# Altium PCB PCB_Adaptor_Board-v1.0.PcbDoc (part 1 of 2)
Units mil, origin at the board's own origin, x right, y up, seen from the top; angles counter-clockwise.
Board outline 5314.96 x 3492.31 mil, 2 copper layers (Top Layer, Bottom Layer), stack 61.811 mil thick; 18 components, 94 nets, 295 pads, 209 vias.
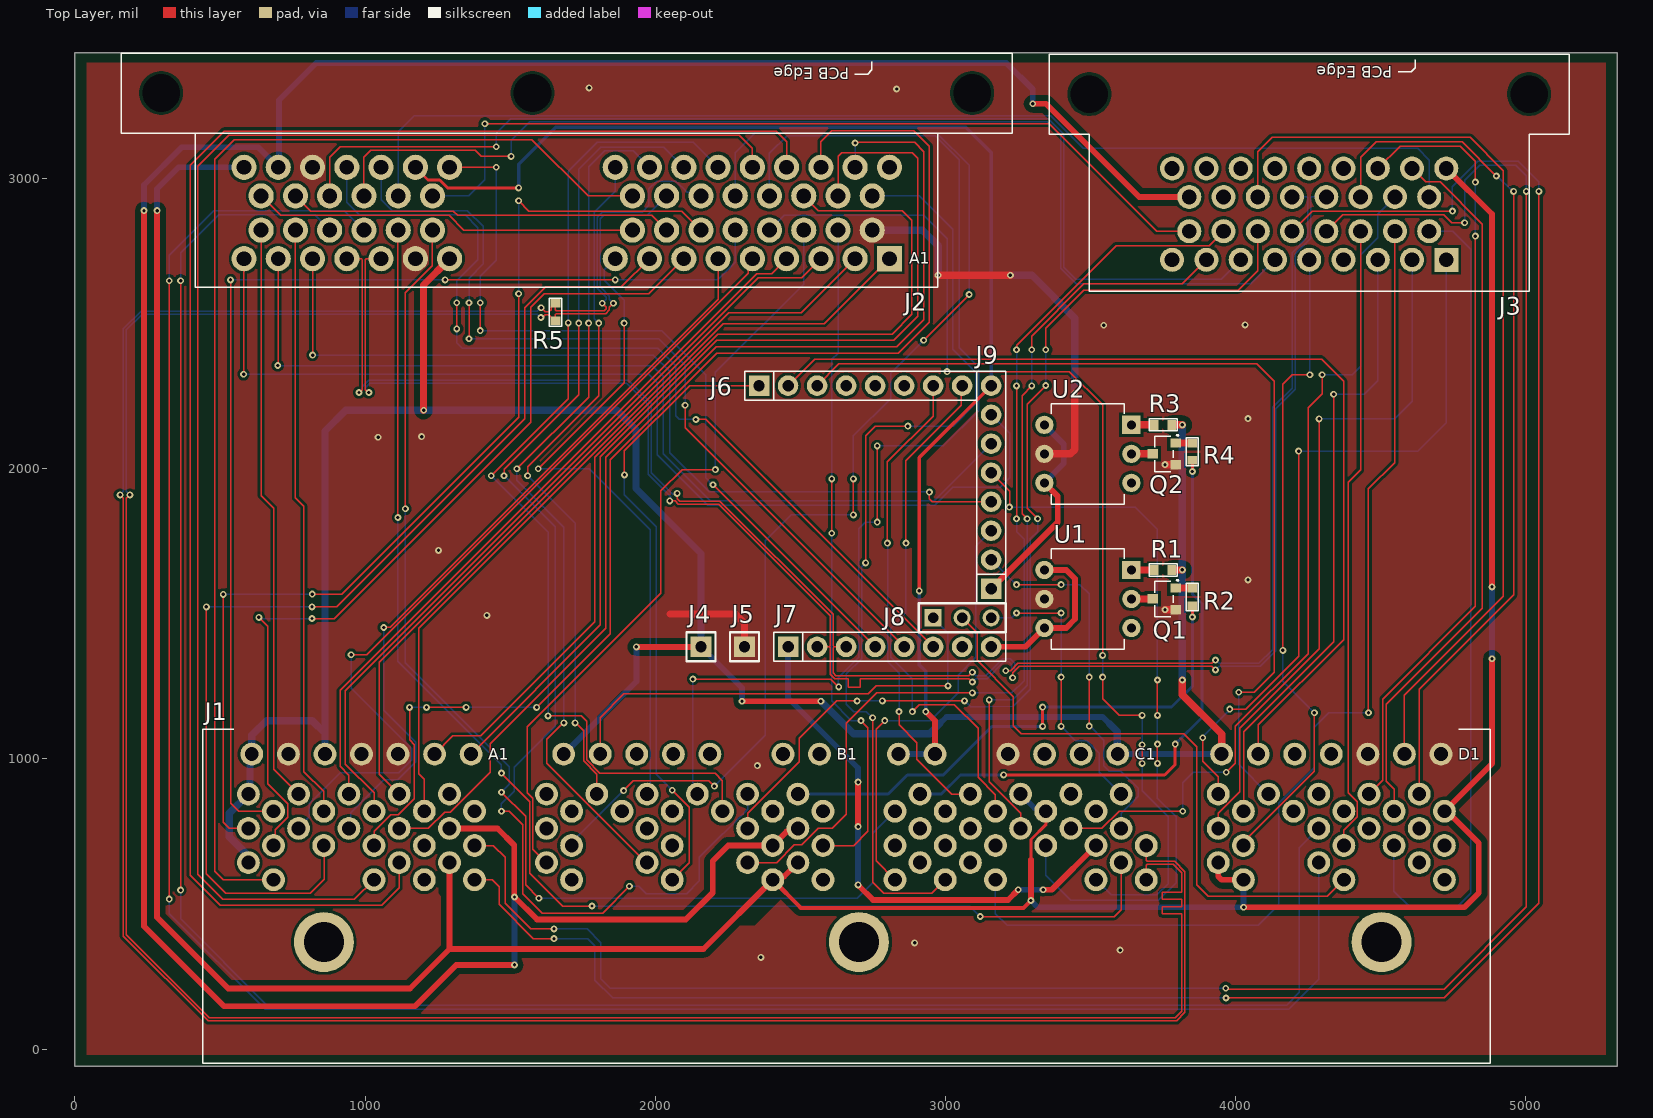
[diagram p0: Top Layer view]
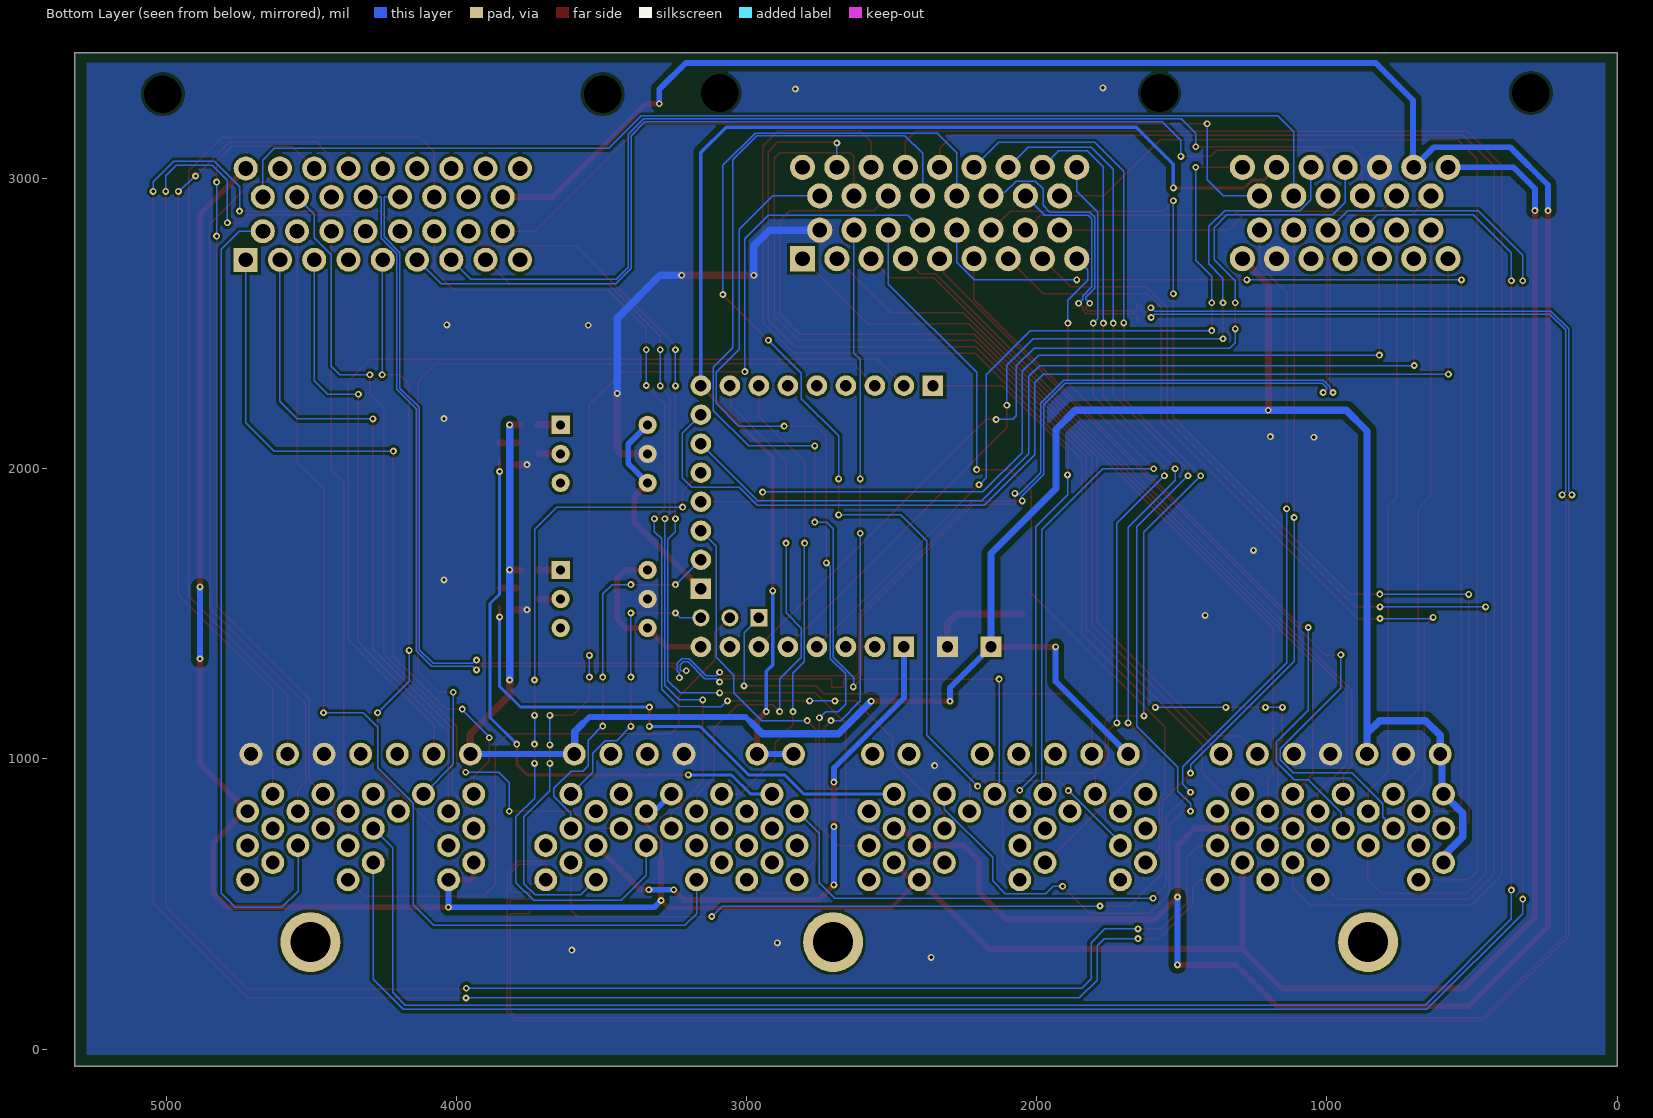
[diagram p1: Bottom Layer view, seen from below]
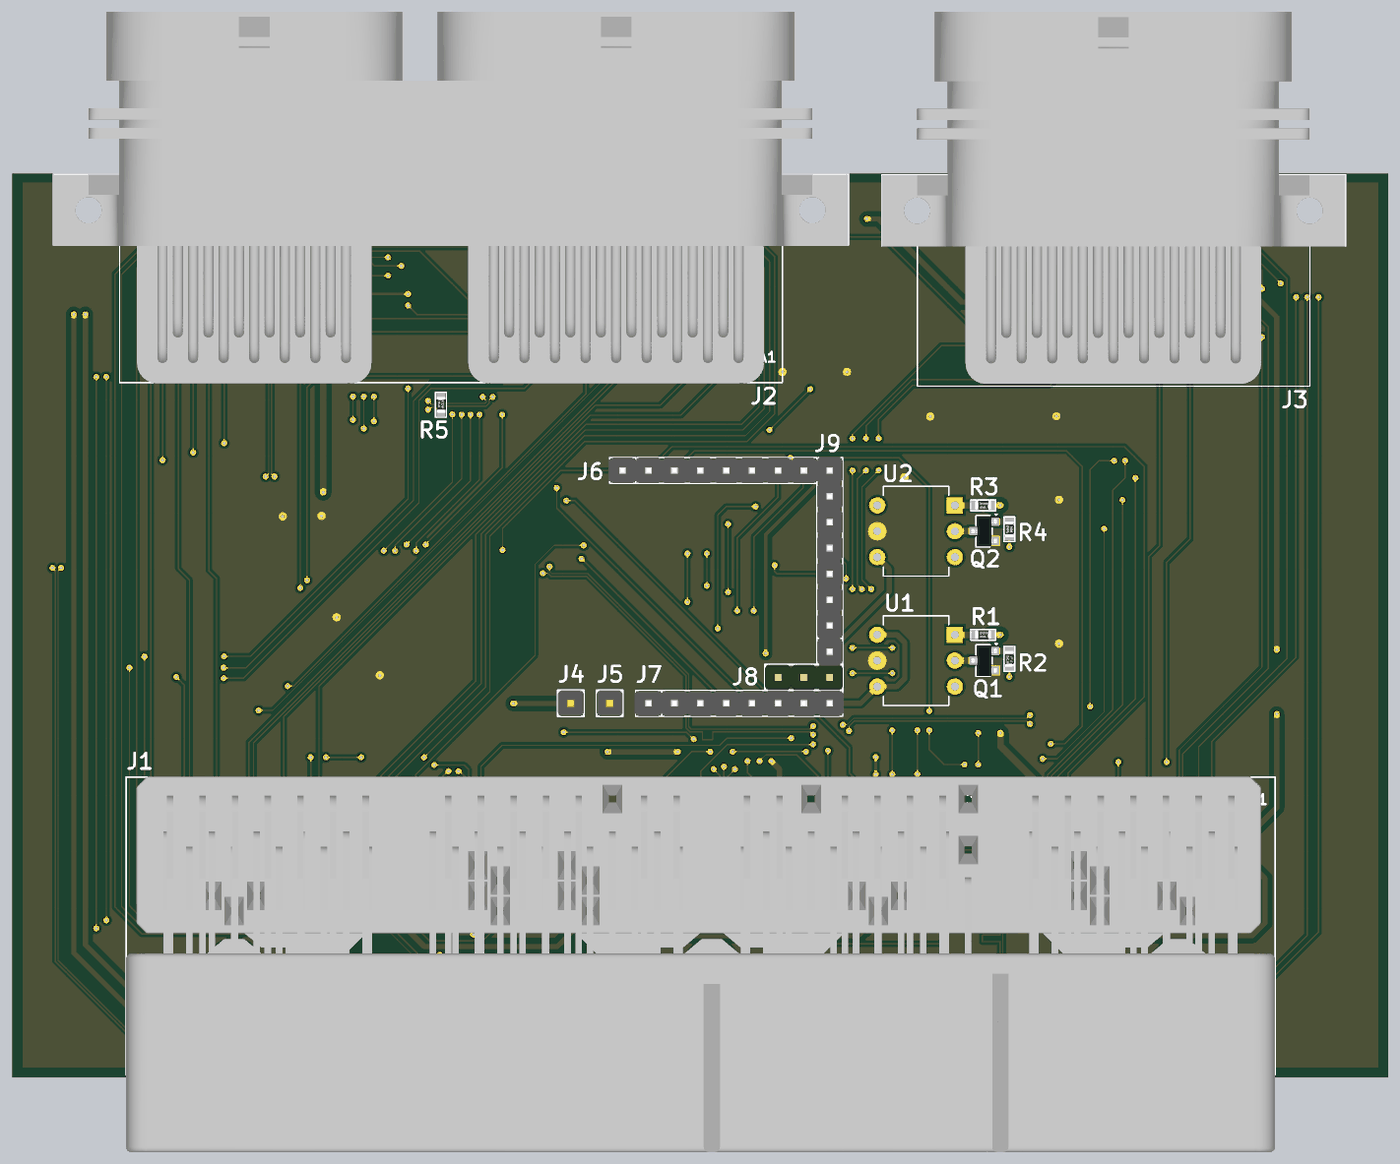
[diagram p3: 3D render of the assembled board from above, using the file's embedded part models]

## Layer stack, top to bottom
Top Solder: solder mask 0.3937, Solder Resist, Dk 3.5
Top Layer: signal copper 1.378
Dielectric 1: dielectric 59.055, FR-4, Dk 4.8
Bottom Layer: signal copper 1.378
Bottom Solder: solder mask 0.3937, Solder Resist, Dk 3.5

## Board outline
0,-59 5314.96,-59 5314.96,3433.31 0,3433.31

## Design rules (kind name [scope] priority, off if disabled: settings)
Clearance Clearance_1 [(InNet('AGND') OR InNet('5V_ECU') OR InNet('5V') OR InNet('12V'))] p1: gap=10 ignorepadtopadclearanceinfootprint=FALSE except(0: Arc-Hole Track-Hole SMDPad-Hole THPad-Hole Via-Hole Fill-Hole Poly-Hole Region-Hole Text-Hole; 5: Arc-THPad Track-THPad; 20: Arc-Fill Arc-Poly Arc-Region Track-Fill Track-Poly Track-Region)
Clearance [All] p2: gap=10 ignorepadtopadclearanceinfootprint=FALSE except(0: Arc-Hole Track-Hole SMDPad-Hole THPad-Hole Via-Hole Fill-Hole Poly-Hole Region-Hole Text-Hole; 5: Arc-Arc Arc-Track Arc-THPad Track-Track Track-THPad)
DiffPairsRouting [All] p1: maxlimit=5.3 minlimit=5.3 mostfreqgap=5.3 toplayer_minwidth=5 toplayer_maxwidth=5 toplayer_prefwidth=5 bottomlayer_minwidth=5 bottomlayer_maxwidth=5 bottomlayer_prefwidth=5 impedanceprofiledriven=TRUE impedanceprofileid={C063A5C5-D187-42DF-A67E-2EF729EBF0FC} impedanceprofilevalue=120.000000 maxuncoupledlength=500
Height [All] p1: minheight=0 maxheight=1500 prefheight=1000
HoleSize [All] p1: absolutevalues=TRUE maxlimit=1000 minlimit=1 maxpercent=80.000 minpercent=20.000
HoleToHoleClearance [All] p1: gap=0 allowstackedmicrovias=TRUE
MatchedLengths "Schematic Matched Net Lengths_3" [InNet('CAN1_P')] p1: tolerance=20 checknetsindiffpair=TRUE checkdiffpairvsdiffpair=FALSE checkxsignals=FALSE checkothers=FALSE
MatchedLengths "Schematic Matched Net Lengths_2" [InNet('CAN1_N')] p2: tolerance=20 checknetsindiffpair=TRUE checkdiffpairvsdiffpair=FALSE checkxsignals=FALSE checkothers=FALSE
MatchedLengths "Schematic Matched Net Lengths_1" [InNet('CANHH_P')] p3: tolerance=20 checknetsindiffpair=TRUE checkdiffpairvsdiffpair=FALSE checkxsignals=FALSE checkothers=FALSE
MatchedLengths "Schematic Matched Net Lengths" [InNet('CANHH_N')] p4: tolerance=20 checknetsindiffpair=TRUE checkdiffpairvsdiffpair=FALSE checkxsignals=FALSE checkothers=FALSE
MaxMinImpedance "Schematic Impedance Constraint_3" [InNet('CAN1_N')] p1: minimum=118.0 maximum=120.0
MaxMinImpedance "Schematic Impedance Constraint_2" [InNet('CAN1_P')] p2: minimum=118.0 maximum=120.0
MaxMinImpedance "Schematic Impedance Constraint_1" [InNet('CANHH_N')] p3: minimum=118.0 maximum=120.0
MaxMinImpedance "Schematic Impedance Constraint" [InNet('CANHH_P')] p4: minimum=118.0 maximum=120.0
MinimumSolderMaskSliver [All] p1: minsoldermaskwidth=0
PolygonConnect [All] p1: connectstyle=Direct reliefconductorwidth=10 reliefentries=4 polygonreliefangle="90 Angle" airgapwidth=10
RoutingVias [All] p1: holewidth=11.81 width=23.62 viastyle="Through Hole" minholewidth=11.81 minwidth=23.62 maxholewidth=28 maxwidth=50
SilkToSilkClearance [All] p1: silktosilkclearance=0
SilkToSolderMaskClearance [IsPad] p1: minsilkscreentomaskgap=0 clearancetoexposedcopper=TRUE
SolderMaskExpansion [All] p1: expansion=4 istentingtop=FALSE
UnRoutedNet [All] p1: checkbadconnections=TRUE
Width [All] p1: maxlimit=40 minlimit=5 preferedwidth=10 minimp=50.000000 maximp=50.000000 favimp=50.000000
22 further rules are at their usual default settings.

## Classes and differential pairs
differential pair CAN1: +CAN1_P -CAN1_N
differential pair CANHH: +CANHH_P -CANHH_N

## Components (designator, comment, footprint, x,y, rotation, side; value= is the part's Value field where it differs from the comment)
J1 "1-1376430-8" 1-1376430-8 2658.85,692.79 r0 top locked
J2 "6437288-3" 6437288-3 1694.91,3009.59 r180 top locked
J3 "6437288-2" 6437288-2 4253.97,3005.91 r180 top locked
J4 "X6511WV-01H-C60D30" "HDR 1x1 TH Male" 2157.74,1386.49 r0 top locked
J5 "X6511WV-01H-C60D30" "HDR 1x1 TH Male" 2307.74,1386.49 r0 top locked
J6 "X6511WV-08H-C60D30" "HDR 1x8 TH male" 2707.74,2286.49 r0 top locked
J7 "X6511WV-08H-C60D30" "HDR 1x8 TH male" 2807.74,1386.49 r0 top locked
J8 "X6511WV-03H-C60D30" HDR1X3_ 2957.74,1486.49 r0 top locked
J9 "X6511WV-08H-C60D30" "HDR 1x8 TH male" 3157.74,1936.49 r90 top locked
Q1 "MMBT2222A-7-F" SOT-23 3754.16,1551.65 r270 top locked
Q2 "MMBT2222A-7-F" SOT-23 3754.16,2051.65 r270 top locked
R1 "2.2K" Res-0603 3750.29,1651.49 r0 top locked value=2.2kR
R2 "10K" Res-0603 3851.16,1558.15 r90 top locked
R3 "2.2K" Res-0603 3750.29,2151.49 r0 top locked value=2.2kR
R4 "10K" Res-0603 3851.16,2059.15 r90 top locked
R5 "120R" Res-0603 1656.16,2540.15 r270 top locked
U1 "AQV-252G" 6-DIP 3490.99,1551.49 r180 top locked value=0.8pF
U2 "AQV-252G" 6-DIP 3490.99,2051.49 r180 top locked value=0.8pF

## Footprints (in the part's own frame and the unit in brackets; to place one, negate y for a bottom-side part, rotate by r counter-clockwise, add the part's x,y. Pads: shape width x height; smd on the part's side, far side on the other; paste and mask are expansions set on the pad)
1-1376430-8 [mm]
  round 2 hole 1.21 paste+0 mask+0: A1(-32.85,8.225) A2(-36.05,8.225) A3(-39.25,8.225) A4(-42.45,8.225) A5(-45.65,8.225) A6(-48.85,8.225) A7(-52.05,8.225) A8(-32.55,3.225) A9(-34.75,4.725) A10(-36.95,3.225) A11(-39.15,4.725) A12(-41.35,3.225) A13(-43.55,4.725) A14(-45.75,3.225) A15(-47.95,4.725) A16(-50.15,3.225) A17(-52.35,4.725) A18(-32.55,0.225) A19(-34.75,1.725) A20(-36.95,0.225) A21(-39.15,1.725) A22(-41.35,0.225) A23(-43.55,1.725) A24(-45.75,0.225) A25(-47.95,1.725) A26(-50.15,0.225) A27(-52.35,1.725) A28(-32.55,-2.775) A29(-34.75,-1.275) A30(-36.95,-2.775) A31(-39.15,-1.275) A32(-41.35,-2.775) A33(-50.15,-2.775) A34(-52.35,-1.275) B1(-2.35,8.225) B2(-5.55,8.225) B3(-11.95,8.225) B4(-15.15,8.225) B5(-18.35,8.225) B6(-21.55,8.225) B7(-24.75,8.225) B8(-2.05,3.225) B9(-4.25,4.725) B10(-6.45,3.225) B11(-8.65,4.725) B12(-10.85,3.225) B13(-13.05,4.725) B14(-15.25,3.225) B15(-17.45,4.725) B16(-19.65,3.225) B17(-21.85,4.725) B18(-24.05,3.225) B19(-26.25,4.725) B20(-2.05,0.225) B21(-4.25,1.725) B22(-6.45,0.225) B23(-8.65,1.725) B24(-15.25,0.225) B25(-17.45,1.725) B26(-24.05,0.225) B27(-26.25,1.725) B28(-2.05,-2.775) B29(-4.25,-1.275) B30(-6.45,-2.775) B31(-8.65,-1.275) B32(-15.25,-2.775) B33(-17.45,-1.275) B34(-24.05,-2.775) B35(-26.25,-1.275) C1(23.75,8.225) C2(20.55,8.225) C3(17.35,8.225) C4(14.15,8.225) C5(7.75,8.225) C6(4.55,8.225) C7(24.05,4.725) C8(21.85,3.225) C9(19.65,4.725) C10(17.45,3.225) C11(15.25,4.725) C12(13.05,3.225) C13(10.85,4.725) C14(8.65,3.225) C15(6.45,4.725) C16(4.25,3.225) C17(26.25,0.225) C18(24.05,1.725) C19(21.85,0.225) C20(19.65,1.725) C21(17.45,0.225) C22(15.25,1.725) C23(13.05,0.225) C24(10.85,1.725) C25(8.65,0.225) C26(6.45,1.725) C27(4.25,0.225) C28(26.25,-2.775) C29(24.05,-1.275) C30(21.85,-2.775) C31(13.05,-2.775) C32(10.85,-1.275) C33(8.65,-2.775) C34(6.45,-1.275) C35(4.25,-2.775) D1(52.05,8.225) D2(48.85,8.225) D3(45.65,8.225) D4(42.45,8.225) D5(39.25,8.225) D6(36.05,8.225) D7(32.85,8.225) D8(52.35,3.225) D9(50.15,4.725) D10(47.95,3.225) D11(45.75,4.725) D12(43.55,3.225) D13(41.35,4.725) D14(39.15,3.225) D15(36.95,4.725) D16(34.75,3.225) D17(32.55,4.725) D18(52.35,0.225) D19(50.15,1.725) D20(47.95,0.225) D21(45.75,1.725) D22(43.55,0.225) D23(41.35,1.725) D24(34.75,0.225) D25(32.55,1.725) D26(52.35,-2.775) D27(50.15,-1.275) D28(43.55,-2.775) D29(41.35,-1.275) D30(34.75,-2.775) D31(32.55,-1.275)
  round 5.25 hole 3.5 paste+0 mask+0: MH1(46.85,-8.225) MH2(1.1,-8.225) MH3(-45.75,-8.225)
  silkscreen extent -56.35,-18.83 56.35,10.4, body extent -56.35,-26.42 56.35,10.43, height 22.7
6-DIP [mm]
  rect 1.6x1.6 / inner round 1.6 / far side rect 1.6x1.6 hole 0.8: 1(-3.81,-2.54)
  round 1.6 hole 0.8: 2(-3.81,0) 3(-3.81,2.54) 4(3.81,2.54) 5(3.81,0) 6(3.81,-2.54)
  silkscreen extent -3.2,-4.4 3.2,4.4
6437288-2 [mm]
  rect 2.1x2.1 hole 1.3: B1(-12,7.25)
  round 2.1 hole 1.3: B2(-9,7.25) B3(-6,7.25) B4(-3,7.25) B5(0,7.25) B6(3,7.25) B7(6,7.25) B8(9,7.25) B9(12,7.25) B10(-10.5,4.75) B11(-7.5,4.75) B12(-4.5,4.75) B13(-1.5,4.75) B14(1.5,4.75) B15(4.5,4.75) B16(7.5,4.75) B17(10.5,4.75) B18(-10.5,1.75) B19(-7.5,1.75) B20(-4.5,1.75) B21(-1.5,1.75) B22(1.5,1.75) B23(4.5,1.75) B24(7.5,1.75) B25(10.5,1.75) B26(-12,-0.75) B27(-9,-0.75) B28(-6,-0.75) B29(-3,-0.75) B30(0,-0.75) B31(3,-0.75) B32(6,-0.75) B33(9,-0.75) B34(12,-0.75)
  round 0 hole 3.3 unplated: ""(-19.25,-7.25) ""(19.25,-7.25)
  silkscreen extent -22.75,-10.75 22.75,10, body extent -22.72,-26.72 22.78,9.78, height 28.25
6437288-3 [mm]
  rect 2.2x2.2 hole 1.3: A1(-28.25,7.25)
  round 2.2 hole 1.3: A2(-25.25,7.25) A2(-25.25,7.25) A3(-22.25,7.25) A4(-19.25,7.25) A5(-16.25,7.25) A6(-13.25,7.25) A7(-10.25,7.25) A8(-7.25,7.25) A9(-4.25,7.25) A10(-26.75,4.75) A11(-23.75,4.75) A12(-20.75,4.75) A13(-17.75,4.75) A14(-14.75,4.75) A15(-11.75,4.75) A16(-8.75,4.75) A17(-5.75,4.75) A18(-26.75,1.75) A19(-23.75,1.75) A20(-20.75,1.75) A21(-17.75,1.75) A22(-14.75,1.75) A23(-11.75,1.75) A24(-8.75,1.75) A25(-5.75,1.75) A26(-28.25,-0.75) A27(-25.25,-0.75) A28(-22.25,-0.75) A29(-19.25,-0.75) A30(-16.25,-0.75) A31(-13.25,-0.75) A32(-10.25,-0.75) A33(-7.25,-0.75) A34(-4.25,-0.75) C1(10.25,7.25) C2(13.25,7.25) C3(16.25,7.25) C4(19.25,7.25) C5(22.25,7.25) C6(25.25,7.25) C7(28.25,7.25) C8(11.75,4.75) C9(14.75,4.75) C10(17.75,4.75) C11(20.75,4.75) C12(23.75,4.75) C13(26.75,4.75) C14(11.75,1.75) C15(14.75,1.75) C16(17.75,1.75) C17(20.75,1.75) C18(23.75,1.75) C19(26.75,1.75) C20(10.25,-0.75) C21(13.25,-0.75) C22(16.25,-0.75) C23(19.25,-0.75) C24(22.25,-0.75) C25(25.25,-0.75) C26(28.25,-0.75)
  round 0 hole 3.3 unplated: ""(-35.5,-7.25) ""(3,-7.25) ""(35.5,-7.25)
  silkscreen extent -39,-10.75 39,9.75, body extent -38.95,-26.67 39.05,9.83, height 28.15
HDR1X3_ [mm] "Connector; Header; 3 Position"
  rect 1.5x1.5 hole 0.9: 1(0,0)
  round 1.5 hole 0.9: 2(2.54,0) 3(5.08,0)
  silkscreen extent -1.27,-1.27 6.35,1.27, body extent -1.27,-1.24 6.35,1.25, height 8.54
"HDR 1x1 TH Male" [mm]
  rect 1.8x1.8 hole 1: 1(0,0)
  silkscreen extent -1.27,-1.27 1.27,1.27, body extent -1.27,-1.27 1.28,1.27, height 8.5
"HDR 1x8 TH male" [mm]
  rect 1.8x1.8 hole 1 paste+0 mask+0.051: 1(-8.89,0)
  round 1.8 hole 1 paste+0 mask+0.051: 2(-6.35,0) 3(-3.81,0) 4(-1.27,0) 5(1.27,0) 6(3.81,0) 7(6.35,0) 8(8.89,0)
  silkscreen extent -10.16,-1.27 10.16,1.27, body extent -10.26,-1.25 10.27,1.25, height 8.5
Res-0603 [mil]
  rect 30x35 smd: 1(-30,0) 2(30,0)
  silkscreen extent -48,-21 48,21, body extent -31,-17 31,17, height 18
SOT-23 [mm] "TRANS NPN 40V 0.6A SOT23"
  rect 0.82x0.92 smd: 1(-0.95,1) 2(0.95,1) 3(0,-1)
  silkscreen extent -1.68,-0.81 1.55,1.3, body extent -1.5,-1.25 1.5,1.25, height 1.05

## Part data
J1: "025/040 135POS CAP ASSY H TIN", Manufacturer="TE Connectivity Raychem", Supplier Part Number 1=17-1-1376430-8-ND, Category=Connectors, Item Type=Connector, Manufacturer Part Number=1-1376430-8, Pricing 1="1=11.55, 12=10.02667 (USD)", RoHS=Yes, Stock 1=1632, Supplier 1=Digikey
J2: "CONN HEADER R/A 60POS 3MM", Manufacturer="TE Connectivity", Supplier Part Number 1=A122211-ND, Category="Headers and Wire Housings", ComponentLink1Description=https://datasheet.ciiva.com/11742/0900766b80fa0058-11742813.pdf?src-supplier=Rs, ComponentLink1URL=https://datasheet.ciiva.com/11742/0900766b80fa0058-11742813.pdf?src-supplier=Rs, ComponentLink2Description=https://datasheet.ciiva.com/31837/18928ddetrolleractionshowdocdocidcatalogsection7f1308072-2-gad-lit-31837713.pdf?src-supplier=Onlinecomponents.com, ComponentLink2URL=https://datasheet.ciiva.com/31837/18928ddetrolleractionshowdocdocidcatalogsection7f1308072-2-gad-lit-31837713.pdf?src-supplier=Onlinecomponents.com, ComponentLink3Description=https://datasheet.ciiva.com/9491/eng-cs-1308072-2-gad-lit-amp-superseal-0608-9491339.pdf?src-supplier=Avnet, ComponentLink3URL=https://datasheet.ciiva.com/9491/eng-cs-1308072-2-gad-lit-amp-superseal-0608-9491339.pdf?src-supplier=Avnet, Item Type=Connector, Manufacturer Part Number=6437288-3, Pricing 1="1=23.56, 16=19.44938, 104=16.70635, 504=15.95829 (USD)", RoHS=Yes, Stock 1=2119, Supplier 1=Digikey
J3: "CONN HEADER R/A 34POS 3MM", Manufacturer="TE Connectivity", Supplier Part Number=69AH5934, ComponentLink1Description=https://datasheet.ciiva.com/11755/0900766b80f79e47-11755892.pdf?src-supplier=Rs, ComponentLink1URL=https://datasheet.ciiva.com/11755/0900766b80f79e47-11755892.pdf?src-supplier=Rs, ComponentLink2Description=https://datasheet.ciiva.com/9496/eng-cs-1308072-2-gad-lit-amp-superseal-0608-9496917.pdf?src-supplier=Avnet, ComponentLink2URL=https://datasheet.ciiva.com/9496/eng-cs-1308072-2-gad-lit-amp-superseal-0608-9496917.pdf?src-supplier=Avnet, Item Type=Connectors, Manufacturer Part Number=6437288-2, Pricing="1=21.65, 5=21.15, 10=20.79, 25=20.4, 50=19.97 (USD)", RoHS=Yes, Stock=15, Supplier=Avnet
J4 J5: "Gold 250V 3A Square Pins 2.5mm 1P 260℃ 6mm -40℃~+105℃ 3mm 2.54mm Brass Black Plugin 2.54mm 1x1P Plugin,P=2.54mm Pin Headers ROHS", LCSC Part Number=C5242194, Manufacturer=XKB, Package=Plugin,P=2.54mm, ComponentLink1Description=LCSC, ComponentLink1URL=https://www.lcsc.com/product-detail/Pin-Headers_XKB-Connection-X6511WV-01H-C60D30_C5242194.html, Item Type="Male Header", Manufacturer Part Number=X6511WV-01H-C60D30
J6 J7 J9: "Gold 250V 3A Square Pins 2.5mm 8P 260℃ 6mm -40℃~+105℃ 3mm 2.54mm Plugin Black Brass 2.54mm 1x8P Plugin,P=2.54mm Pin Headers ROHS", LCSC Part Number=C706880, Manufacturer=XKB, Package=Plugin,P=2.54mm, ComponentLink1Description=LCSC, ComponentLink1URL=https://www.lcsc.com/product-detail/Pin-Headers_XKB-Connection-X6511WV-08H-C60D30_C706880.html, Item Type="Male Header", Manufacturer Part Number=X6511WV-08H-C60D30
J8: "Gold 250V 3A Straight Square Pins 2.5mm 3P 260℃ 6mm -40℃~+105℃ 3mm 2.54mm Plugin Black Brass 1x3P Plugin,P=2.54mm Pin Headers ROHS", LCSC Part Number=C706875, Manufacturer=XKB, Package=Plugin,P=2.54mm, ComponentLink1Description=LCSC, ComponentLink1URL=https://www.lcsc.com/product-detail/Pin-Headers_XKB-Connectivity-X6511WV-03H-C60D30_C706875.html, Item Type="Male Header", Manufacturer Part Number=X6511WV-03H-C60D30
Q1 Q2: "TRANS NPN 40V 0.6A SMD SOT23-3", Case/Package=SOT-23, Collector Base Voltage (VCBO)=75V, Collector Emitter Breakdown Voltage=40V, Collector Emitter Saturation Voltage=1V, Continuous Collector Current=600mA, Current=1A, Emitter Base Voltage (VEBO)=6V, Frequency=300MHz, LCSC Part Number=C94515, Manufacturer=Diodes, Max Operating Temperature=150°C, Max Power Dissipation=300mW, Min Operating Temperature=-55°C, Package Quantity=3000, Power Dissipation=350mW, Supplier Part Number 1=MMBT2222A-FDIDKR-ND, Collector Emitter Voltage (VCEO)=40V, ComponentLink1Description=http://www.diodes.com/datasheets/ds30041.pdf?src-supplier=Future+Electronics, ComponentLink1URL=http://www.diodes.com/datasheets/ds30041.pdf?src-supplier=Future+Electronics, ComponentLink2Description=http://www.diodes.com/datasheets/ds30041.pdf?src-supplier=Avnet, ComponentLink2URL=http://www.diodes.com/datasheets/ds30041.pdf?src-supplier=Avnet, ComponentLink3Description=https://www.verical.com/server-webapp/html/getDatasheet?partID=82692&src-supplier=Verical, ComponentLink3URL=https://www.verical.com/server-webapp/html/getDatasheet?partID=82692&src-supplier=Verical, ComponentLink4Description=https://www.diodes.com/assets/Datasheets/ds30041.pdf?src-supplier=Digi-Key, ComponentLink4URL=https://www.diodes.com/assets/Datasheets/ds30041.pdf?src-supplier=Digi-Key, ComponentLink5Description=http://www.diodes.com/datasheets/ds30041.pdf?src-supplier=Avnet+Europe, ComponentLink5URL=http://www.diodes.com/datasheets/ds30041.pdf?src-supplier=Avnet+Europe, ComponentLink6Description=http://www.diodes.com/datasheets/ds30041.pdf?src-supplier=Element14, ComponentLink6URL=http://www.diodes.com/datasheets/ds30041.pdf?src-supplier=Element14, Contact Plating=Matte,Tin, Current Rating=600mA, Element Configuration=Single, Gain Bandwidth Product=300MHz, Height=1mm, hFE Min=100, Item Type=Mosfet, Lead Free="Lead Free", Length=3.05mm, Manufacturer Part Number=MMBT2222A-7-F, Max Breakdown Voltage=40V, Max Collector Current=600mA, Max Frequency=300MHz, Mount="Surface Mount", Number of Elements=1, Number of Pins=3, Packaging="Tape and Reel", Polarity=NPN, Pricing 1="1=0.15, 10=0.134, 100=0.0729, 500=0.04486, 1000=0.03059 (USD)", Radiation Hardening=No, REACH SVHC="No SVHC", Stock 1=2471182, Supplier 1=Digi-Key, Termination=SMD/SMT, Transition Frequency=300MHz, Voltage=40V, Voltage Rating (DC)=40V, Weight=0.000282oz, Width=1.4mm
R1 R3: library part RT0603BRB072K2L, "RES SMD 2.2K OHM 0.1% 1/10W 0603", Case Code (Imperial)=0603, Case Code (Metric)=1608, LCSC Part Number=C860297, Manufacturer=Yageo, Max Operating Temperature=155°C, Max Power Dissipation=100mW, Min Operating Temperature=-55°C, Supplier Part Number=YAG2182CT-ND, Temperature Coefficient=10ppm/°C, Tolerance=0.1%, Case/Package=0603, Category="Chip SMD Resistors", ComponentLink1Description=http://www.yageo.com/documents/recent/PYu-RT_1-to-0.01_RoHS_L_7.pdf?src-supplier=Digi-Key, ComponentLink1URL=http://www.yageo.com/documents/recent/PYu-RT_1-to-0.01_RoHS_L_7.pdf?src-supplier=Digi-Key, ComponentLink2Description=http://www.yageo.com/documents/recent/PYu-RT_1-to-0.01_RoHS_L_9.pdf?src-supplier=Digi-Key, ComponentLink2URL=http://www.yageo.com/documents/recent/PYu-RT_1-to-0.01_RoHS_L_9.pdf?src-supplier=Digi-Key, Item Type=Resistor, Manufacturer Part Number=RT0603BRB072K2L, Number of Terminations=2, Packaging="Cut Tape", Pricing="1=0.6, 10=0.446, 50=0.3148, 100=0.2597, 500=0.1836, 1000=0.14563 (USD)", RoHS=Yes, RoHS Compliant=Yes, Series=RT, Stock=518, Supplier=Digi-Key
R2 R4: library part RC0603FR-0710KL, "RES SMD 10K Ohm 1% 1/10W 0603", Case Code (Imperial)=0603, Case Code (Metric)=1608, LCSC Part Number=C98220, Manufacturer=Yageo, Max Operating Temperature=155°C, Max Power Dissipation=100mW, Min Operating Temperature=-55°C, Resistance=10kR, Resistance Tolerance=1%, Resistor Type="Thick Film", Supplier Part Number 1=311-10.0KHRCT-ND, Temperature Coefficient=100ppm/°C, Voltage Rating=75V, Voltage Rating (DC)=50V, Case/Package=0603, Category="Chip SMD Resistors", ComponentLink1Description=https://datasheet.ciiva.com/7660/38590-7660789.pdf?src-supplier=Element14, ComponentLink1URL=https://datasheet.ciiva.com/7660/38590-7660789.pdf?src-supplier=Element14, ComponentLink2Description=https://datasheet.ciiva.com/7983/443971-7983596.pdf?src-supplier=Element14, ComponentLink2URL=https://datasheet.ciiva.com/7983/443971-7983596.pdf?src-supplier=Element14, ComponentLink3Description=https://datasheet.ciiva.com/22747/443971-22747519.pdf?src-supplier=Element14, ComponentLink3URL=https://datasheet.ciiva.com/22747/443971-22747519.pdf?src-supplier=Element14, ComponentLink4Description=https://datasheet.ciiva.com/46440/1868787-46440891.pdf?src-supplier=Element14, ComponentLink4URL=https://datasheet.ciiva.com/46440/1868787-46440891.pdf?src-supplier=Element14, ComponentLink5Description=https://datasheet.ciiva.com/7746/1738695-7746239.pdf?src-supplier=Element14, ComponentLink5URL=https://datasheet.ciiva.com/7746/1738695-7746239.pdf?src-supplier=Element14, ComponentLink6Description=https://datasheet.ciiva.com/15189/getdatasheetpartid-409289-15189591.pdf?src-supplier=Verical, ComponentLink6URL=https://datasheet.ciiva.com/15189/getdatasheetpartid-409289-15189591.pdf?src-supplier=Verical, Construction=Rectangular, Depth=0.8mm, Features="Moisture Resistant", Height=0.45mm, Item Type=Resistor, Lead Free="Lead Free", Lead Pitch=0.3mm, Length=1.6mm, Manufacturer Part Number=RC0603FR-0710KL, Military Standard=Not, Number of Pins=2, Number of Terminations=2, Packaging="Tape and Reel", Power Rating=100mW, Pricing 1="1=0.10000, 10=0.02400, 100=0.00970, 1000=0.00436, 2500=0.00378 (USD)", REACH SVHC=Unknown, RoHS=Yes, RoHS Compliant=Yes, Series=RC, Size Code=0603, Stock 1=25249139, Supplier 1=Digi-Key, Termination=SMD/SMT, Tolerance=1%, Weight=7.1E-05oz, Width=0.8mm
R5: library part RC0603FR-07120RL, "RES 120 OHM 1% 1/10W 0603", Case Code (Imperial)=0603, Case Code (Metric)=1608, LCSC Part Number=C114640, Manufacturer=Yageo, Max Operating Temperature=155°C, Max Power Dissipation=100mW, Min Operating Temperature=-55°C, Package Quantity=1, Resistance Tolerance=1%, Resistor Type="Thick Film", Supplier Part Number 1=311-120HRCT-ND, Temperature Coefficient=100ppm/°C, Voltage Rating=50V, Case/Package=0603, Category="Chip SMD Resistors", ComponentLink1Description=https://datasheet.ciiva.com/2553/pyu-r-int-thick-7-2553512.pdf?src-supplier=Digi-Key, ComponentLink1URL=https://datasheet.ciiva.com/2553/pyu-r-int-thick-7-2553512.pdf?src-supplier=Digi-Key, ComponentLink2Description=https://datasheet.ciiva.com/7746/443971-7746248.pdf?src-supplier=Element14, ComponentLink2URL=https://datasheet.ciiva.com/7746/443971-7746248.pdf?src-supplier=Element14, ComponentLink3Description=https://datasheet.ciiva.com/2553/pyu-r-int-thick-7-2553513.pdf?src-supplier=Digi-Key, ComponentLink3URL=https://datasheet.ciiva.com/2553/pyu-r-int-thick-7-2553513.pdf?src-supplier=Digi-Key, ComponentLink4Description=https://datasheet.ciiva.com/7746/443971-7746249.pdf?src-supplier=Element14, ComponentLink4URL=https://datasheet.ciiva.com/7746/443971-7746249.pdf?src-supplier=Element14, ComponentLink5Description=https://datasheet.ciiva.com/2553/pyu-r-int-thick-7-2553514.pdf?src-supplier=Digi-Key, ComponentLink5URL=https://datasheet.ciiva.com/2553/pyu-r-int-thick-7-2553514.pdf?src-supplier=Digi-Key, ComponentLink6Description=https://datasheet.ciiva.com/46395/443971-46395021.pdf?src-supplier=Element14, ComponentLink6URL=https://datasheet.ciiva.com/46395/443971-46395021.pdf?src-supplier=Element14, Construction=Rectangular, Depth=0.8mm, Features="Moisture Resistant", Height=0.022inch, Item Type=Resistor, Lead Free="Lead Free", Length=1.6mm, Manufacturer Part Number=RC0603FR-07120RL, Military Standard=Not, Number of Pins=2, Number of Terminations=2, Packaging="Tape and Reel", Power Rating=100mW, Pricing 1="1=0.10000, 10=0.02400, 100=0.00970, 1000=0.00436, 2500=0.00378 (USD)", REACH SVHC="No SVHC", Resistance=120R, RoHS=Yes, RoHS Compliant=Yes, Series=RC, Size Code=0603, Stock 1=839061, Supplier 1=Digi-Key, Termination=SMD/SMT, Tolerance=1%, Voltage Rating (DC)=50V, Width=0.031inch
U1 U2: "SSR RELAY SPST-NO 2.5A 0-60V", Case/Package=DIP, Contact Resistance=80mR, Current Rating=2.5A, Forward Current=500uA, Input Current=50mA, Isolation Voltage=1.5kV, Manufacturer=Panasonic, Max Operating Temperature=85°C, Max Output Voltage=60V, Max Supply Voltage=1.5V, Min Operating Temperature=-40°C, On-state Resistance-Max=120mR, Package Quantity=50, Power Dissipation=550mW, Supplier Part Number=769-AQV252G, Test Voltage=2.5kV, Approvals=UL,VDE, ComponentLink1Description=https://datasheet.ciiva.com/14667/0900766b80e30c04-14667104.pdf?src-supplier=Rs, ComponentLink1URL=https://datasheet.ciiva.com/14667/0900766b80e30c04-14667104.pdf?src-supplier=Rs, ComponentLink2Description=https://datasheet.ciiva.com/19470/991220-19470769.pdf?src-supplier=Jameco, ComponentLink2URL=https://datasheet.ciiva.com/19470/991220-19470769.pdf?src-supplier=Jameco, ComponentLink3Description=https://datasheet.ciiva.com/26327/504861-da-01-en-photomos-relais-1a-2500ma-60v-aqv252g-26327386.pdf?src-supplier=Conrad, ComponentLink3URL=https://datasheet.ciiva.com/26327/504861-da-01-en-photomos-relais-1a-2500ma-60v-aqv252g-26327386.pdf?src-supplier=Conrad, ComponentLink4Description=https://datasheet.ciiva.com/1190/1794196-1190567.pdf?src-supplier=Newark, ComponentLink4URL=https://datasheet.ciiva.com/1190/1794196-1190567.pdf?src-supplier=Newark, ComponentLink5Description=https://datasheet.ciiva.com/48435/cfaqv252g-data-e-48435733.pdf?src-supplier=Distrelec, ComponentLink5URL=https://datasheet.ciiva.com/48435/cfaqv252g-data-e-48435733.pdf?src-supplier=Distrelec, ComponentLink6Description=https://datasheet.ciiva.com/1526/1848833-1526253.pdf?src-supplier=Element14, ComponentLink6URL=https://datasheet.ciiva.com/1526/1848833-1526253.pdf?src-supplier=Element14, ComponentLink7Description=https://datasheet.ciiva.com/2421/photomosdimensions2-2421589.pdf?src-supplier=Digikey, ComponentLink7URL=https://datasheet.ciiva.com/2421/photomosdimensions2-2421589.pdf?src-supplier=Digikey, ComponentLink8Description=https://datasheet.ciiva.com/18421/70158328-18421196.pdf?src-supplier=Allied+Electronics, ComponentLink8URL=https://datasheet.ciiva.com/18421/70158328-18421196.pdf?src-supplier=Allied+Electronics, Contact Type="1 maker", Depth=6.4mm, Height=3.9mm, Input Type=DC, Isolation Voltage-Max=1.5kV, Item Type="Solid State Relays", Lead Free="Lead Free", Length=8.8mm, Load Current=2.5A, Manufacturer Part Number=AQV-252G, Max Input Current=50mA, Max Output current=2.5A, On-State Resistance=80mR, Output Current=2.5A, Output Voltage=60V, Packaging=Rail/Tube, Pins=6, Pricing="1=4.87, 10=3.86, 50=3.86, 100=3.66, 1000=3.04, 10000=3.04 (USD)", Radiation Hardening=No, Reach SVHC Compliant=No, Rise Time=1.1ms, RoHS=Yes, RoHS Compliant=Yes, Series="PhotoMOS™ AQV", Stock=4354, Supplier=Mouser, Termination="PC Pin", Throw Configuration=SPST, Turn-On Delay Time=5ms, Voltage Rating (AC)=60V, Width=6.4mm

## Via types
v1: diameter 23.62, hole 11.81, Top Layer to Bottom Layer, 209 vias

## Nets (pads, with @x,y where several pads share a name; then routed paths per layer and width w, separated by ;. In a path a pad name is that pad's centre, name@x,y a point inside that pad or via, vN(x,y) a via of type N, cw(c..) or ccw(c..) an arc to the next point about the centre after c; other vN are vias at no path point)
5V: J1.C5 J1.C6 J2.C21 J9.8 | length 4536.2
  Top Layer w10: J2.C21@1173.26,3039.12 1216.57,2995.81 1257.03,2995.81 1284.69,2968.15 v1(1529,2968.15)
  Top Layer w12: v1(2910.16,1579.15) 2910.16,2038.91 J9.8@3157.74,2286.49
  Top Layer w20: v1(2932.16,1163.22) 2963.97,1131.41 J1.C5@2963.97,1016.61
  Bottom Layer w10: J1.C5@2964.79,1016.61 J1.C5@2964.79,1017.62 ; J9.8@3157.74,2260.49 J9.8@3157.74,2286.49
  Bottom Layer w12: v1(1529,2968.15) 1529,3050 1656.5,3177.5 3070.53,3177.5 3157.74,3090.29 J9.8@3157.74,2286.49 ; v1(2910.16,1579.15) 2910.16,1323.69 2932.16,1301.69 v1(2932.16,1163.22)
  Bottom Layer w20: J1.C6@2837.98,1016.61 J1.C5@2963.97,1016.61
5V_ECU: J1.A19 J1.B21 J1.B22 J2.C25 J3.B25 | length 10055.9
  Top Layer w20: v1(238,2890) 238,423.31 513.66,147.65 1171.65,147.65 1314.15,290.15 v1(1514.98,290.15) ; J1.A19@1290.74,760.71 1456.06,760.71 1514.16,702.61 1514.16,525.15 v1(1514.98,524.33) 1592.97,446.34 2105.34,446.34 2198.16,539.16 2198.16,648.44 2251.37,701.65 J1.B22@2404.91,701.65 2452.73,749.47 2480.29,749.47 J1.B21@2491.53,760.71 ; v1(3301,3258) 3347,3258 3667.99,2937.01 J3.B25@3840.58,2937.01
  Bottom Layer w20: v1@238,2890.98 238,2978 368,3108 631.94,3108 J2.C25@700.82,3039.12 703.12,3041.42 703.12,3270.12 832,3399 3210,3399 3301,3308 v1(3301,3258) ; v1(1514.98,290.15) v1(1514.98,524.33)
12V: J1.A5 J1.A7 J1.A17 J1.A34 J1.B7 J1.C1 J1.D7 J2.C1 J4.1 R1.2 R3.2 | length 8477.6
  Top Layer w20: v1(1935,1386) J4.1@2154.25,1386 ; J4.1@2154.25,1383 J4.1@2157.74,1386.49 ; v1(2299,1199) v1(2571,1199)
  Top Layer w25: v1@1201,2202 1201,2633.79 J2.C1@1291.37,2724.16 ; R1.2@3780.29,1651.49 v1(3816.78,1651.49) ; R3.2@3780.29,2151.49 v1(3816.78,2151.49) ; v1(3816.78,1272) 3816.78,1221.22 3952.16,1085.84 J1.D7@3952.16,1016.61
  Bottom Layer w20: J1.A34@586.59,676.8 586.59,653.84 J1.A34@597.83,642.6 J1.A34@603.74,636.69 ; J1.B7@1678.46,1016.61 J1.B7@1684.44,1016.61 1935,1267.17 v1(1935,1386) ; J4.1@2157.74,1386.49 2299,1245.23 v1(2299,1199) ; 2981.72,1122.72 3004,1145 3542,1145 3565.28,1121.72 ; J1.C1@3592.74,1017.76 J1.C1@3593.89,1016.61 J1.D7@3952.16,1016.61
  Bottom Layer w25: J1.A34@586.59,676.8 531.6,731.8 531.6,812.59 J1.A17@597.83,878.82 603.74,884.72 603.74,1010.71 J1.A7@609.64,1016.61 609.64,1081.64 660,1132 818.28,1132 861.61,1088.67 ; J1.A5@861.61,1016.61 861.61,1088.67 ; J4.1@2157.74,1386.49 2157.74,1708.26 1934,1932 1934,2135.58 1867.58,2202 v1(1202,2202) 933,2202 861.61,2130.61 861.61,1088.67 ; v1(2571,1199) 2683,1087 2946,1087 2981.72,1122.72 ; 3565.28,1121.72 3592.74,1094.26 J1.C1@3592.74,1017.76 ; v1(3816.78,1272) v1(3816.78,1651.49) v1(3816.78,2151.49)
(A16)/C18: J2.A16 J2.C18 | length 1328.5
  Top Layer w5: J2.C18@759.87,2940.69 812.18,2888.39 1303.61,2888.39 1318.61,2873.39 1988.59,2873.39 J2.A16@2039.4,2822.58
(A17)/C19: J2.A17 J2.C19 | length 1328.5
  Top Layer w5: J2.C19@641.76,2940.69 709.07,2873.39 1289.78,2873.39 1340.58,2822.58 J2.A17@1921.29,2822.58
(B6)/C16: J2.C16 J3.B6 | length 3903.6
  Top Layer w5: J2.C16@996.09,2940.69 996.09,3074.18 1019.92,3098 1379.36,3098 1400.52,3076.84 v1(1503.16,3076.84)
  Bottom Layer w5: v1@1503.16,3080.84 1503.16,3132.16 1567,3196 3350.57,3196 3398,3148.57 3398,2691 3451.75,2637.25 4052.64,2637.25 J3.B6@4135.86,2720.47
(B7)/C17: J2.C17 J3.B7 | length 3879
  Top Layer w5: J2.C17@877.98,2940.69 877.98,3074.18 913.81,3110 v1(1452,3110)
  Bottom Layer w5: v1(1452,3110) 1452,3156 1502,3206 3354.72,3206 3408,3152.72 3408,3050 3408,2695.14 3449.14,2654 3951.28,2654 J3.B7@4017.75,2720.47
(B17)/C14: J2.C14 J3.B17 | length 2977.9
  Top Layer w5: v1(1412.87,3189.25) 3357.32,3189.25 3727.68,2818.9 J3.B17@3840.58,2818.9
  Bottom Layer w5: J2.C14@1232.31,2940.69 1357.75,2940.69 1412.87,2995.81 v1(1412.87,3189.25)
(B18)/C15: J2.C15 J3.B18 | length 3986.5
  Bottom Layer w5: J2.C15@1114.2,2940.69 1114.2,3161.2 1169,3216 3364,3216 3476,3104 4627.6,3104 4667.35,3064.25 J3.B18@4667.35,2937.01
A1/A19: J1.A1 J2.A19 | length 3473.3
  Top Layer w5: J1.A1@1365.55,1016.61 1811.02,1462.09 1811.02,2041.5 2212.52,2443 2822.17,2443 2904.85,2525.68 2904.85,3070.63 2885.56,3089.93 2642.92,3089.93 2629.95,3076.96 J2.A19@2629.95,2940.69
A2/A20: J1.A2 J2.A20 | length 3336.9
  Top Layer w5: J1.A2@1239.56,1016.61 1302.95,1080 1398,1080 1791.02,1473.02 1791.02,2040.06 2215.18,2464.21 2816.37,2464.21 2884.85,2532.69 2884.85,2856.08 2851.04,2889.89 2562.65,2889.89 J2.A20@2511.84,2940.69
A10/A1: J1.A10 J2.A1 | length 2788.5
  Top Layer w5: J1.A10@1204.13,819.76 1204.13,929.28 1185.19,948.22 1185.19,1451.18 2233.83,2499.83 2582.79,2499.83 J2.A1@2807.12,2724.16
A11/A2: J1.A11 J2.A2 | length 2699.3
  Top Layer w5: J1.A11@1117.52,878.82 1049.1,947.23 1049.1,1334.09 2253.25,2538.24 2503.09,2538.24 J2.A2@2689.01,2724.16
A12/A3: J1.A12 J2.A3 | length 2711.1
  Top Layer w5: J1.A12@1030.9,819.76 1030.9,882.82 932.25,981.47 932.25,1234.24 2355.66,2657.65 2504.39,2657.65 J2.A3@2570.9,2724.16
A13/A4: J1.A13 J2.A4 | length 2524.9
  Top Layer w5: J1.A13@944.29,878.82 944.29,943.73 913.97,974.04 913.97,1235.97 2350.66,2672.65 2401.28,2672.65 J2.A4@2452.79,2724.16
A14/C12: J1.A14 J2.C12 | length 2043.3
  Top Layer w5: J2.C12@759.87,2822.58 759.87,1900.13 789.44,1870.56 789.44,956.55 857.67,888.31 J1.A14@857.67,819.76
A15/C13: J1.A15 J2.C13 | length 1997.3
  Top Layer w5: J2.C13@641.76,2822.58 641.76,1907.33 685.16,1863.93 685.16,964.72 J1.A15@771.06,878.82
A16/A14: J1.A16 J2.A14 | length 3840.1
  Top Layer w5: v1(536.16,2651.14) 536.16,847.84 564.24,819.76 J1.A16@684.44,819.76 ; v1@1275.62,2648.16 1278.6,2651.14 v1(1862.24,2651.14)
  Bottom Layer w5: v1(536.16,2651.14) v1(1275.62,2651.14) ; v1(1862.24,2651.14) 2215.4,2651.14 2275.62,2711.36 J2.A14@2275.62,2822.58
A18/B13: J1.A18 J3.B13 | length 7539.6
  Top Layer w5: J1.A18@1377.36,701.65 1442.45,701.65 1483,661.1 1483,503.27 1571.75,414.53 v1(1651.16,414.53) ; v1(3966.07,209.75) 3968.68,207.15 4719.15,207.15 5002,490 v1@5002,2956.45 ; J3.B13@4313.02,2818.9 4370.13,2876 4718.15,2876 4746.02,2848.13 v1(4789.61,2848.13)
  Bottom Layer w5: v1(1651.16,414.53) 1765.47,414.53 1813,367 1813,242 1845.25,209.75 v1(3966.07,209.75) ; v1(4789.61,2848.13) 4789.61,2994.61 4841.15,3046.15 4965.91,3046.15 5001.86,3010.2 v1(5001.86,2956.15)
A21/A27: J1.A21 J2.A27 | length 3850.9
  Top Layer w5: J1.A21@1117.52,760.71 1218.37,760.71 1273.81,816.15 1294.36,816.15 1432,953.79 1432,1053.11 1829.16,1450.26 1829.16,2039.15 2211.16,2421.15 2832.48,2421.15 2925,2513.67 2925,3093.31 2893.62,3124.69 2689.01,3124.69 v1(2689.01,3122.92)
  Bottom Layer w5: J2.A27@2689.01,3039.12 v1(2689.01,3122.92)
A22/A28: J1.A22 J2.A28 | length 4357.9
  Top Layer w5: J1.A22@1030.9,701.65 1030.9,750.8 1087.68,807.58 1114.59,807.58 1170.19,863.18 1170.19,1049.15 1153.16,1066.18 v1@1153.16,1177.15 ; v1(1211.72,1177.86) v1(1348.16,1177.86) ; v1(1591.14,1177.86) 1844.85,1431.57 1844.85,2030.84 2212.01,2398 2837.8,2398 2945,2505.2 2945,3111.31 2890.85,3165.46 2608.46,3165.46 2570.9,3127.9 J2.A28@2570.9,3039.12
  Bottom Layer w5: v1(1153.16,1177.86) v1(1211.72,1177.86) ; v1@1211.72,1174.93 v1@1211.72,1177.15 ; v1(1348.16,1177.86) v1(1591.14,1177.86)
A23/A6: J1.A23 J2.A6 | length 2624.3
  Top Layer w5: v1(1064.21,1453.15) 1086.15,1453.15 2216.57,2583.57 J2.A6@2216.57,2724.16
  Bottom Layer w5: J1.A23@944.29,760.71 950.37,766.79 950.37,815.08 1064.21,928.92 1113.38,928.92 1175.45,990.99 1175.45,1057.48 1064.21,1168.72 v1(1064.21,1453.15)
A24/A8: J1.A24 J2.A8 | length 3739.7
  Top Layer w5: v1(453,1524) 453,603.86 520.19,536.67 810.67,536.67 859.16,585.16 859.16,700.17 J1.A24@857.67,701.65 ; v1(817,1524) 902,1524 1550,2172 1550,2554.31 1622.52,2626.83 1883.02,2626.83 J2.A8@1980.35,2724.16
  Bottom Layer w5: v1(453,1524) v1(817,1524)
A25/A5: J1.A25 J2.A5 | length 2933.4
  Top Layer w5: v1(952,1359) 1006.14,1359 2320.49,2673.35 2320.49,2709.97 J2.A5@2334.68,2724.16
  Bottom Layer w5: J1.A25@771.06,760.71 771.06,763.11 808.3,800.35 808.3,846.24 914.16,952.1 1115.35,952.1 1160.45,997.2 1160.45,1036.03 952,1244.48 v1(952,1359)
A26/A7: J1.A26 J2.A7 | length 3059.1
  Top Layer w5: v1(634.16,1488) 665.16,1457 665.16,914.9 733.82,846.24 733.82,799.31 690.52,756.02 690.52,707.73 J1.A26@684.44,701.65 ; v1(817,1484) 894,1484 1571.05,2161.05 1571.05,2556.04 1618.24,2603.23 1977.53,2603.23 J2.A7@2098.46,2724.16
  Bottom Layer w5: v1(634.16,1488) 638.16,1484 v1(817,1484)
A27/A15: J1.A27 J2.A15 | length 3568.7
  Top Layer w5: v1(511,1567) 511,781.31 531.6,760.71 J1.A27@597.83,760.71 ; v1(818,1568) 919,1568 1529,2178 v1(1529,2603.23) ; v1(1529,2924) 1564.61,2888.39 2091.7,2888.39 J2.A15@2157.51,2822.58
  Bottom Layer w5: v1(511,1567) 512,1568 v1(818,1568) ; v1(1529,2603.23) v1(1529,2924)
A28/B14: J1.A28 J3.B14 | length 7594.9
  Top Layer w5: J1.A28@1377.36,583.54 1438.27,583.54 1462,559.81 1462,498.9 1579.99,380.91 v1(1651.16,380.91) ; v1(3967.16,176.15) 3968.16,177.15 4720.15,177.15 5045.57,502.57 v1(5045.57,2956.15) ; J3.B14@4194.91,2818.9 4263.96,2887.94 v1(4747.69,2887.94)
  Bottom Layer w5: v1(1651.16,380.91) 1768.25,380.91 1792.16,357 1792.16,236.84 1852.85,176.15 v1(3967.16,176.15) ; v1(4747.69,2887.94) 4747.69,2972.97 4834.97,3060.25 4974.75,3060.25 5045.57,2989.43 v1(5045.57,2956.15)
A31/A29: J1.A31 J2.A29 | length 5529.7
  Top Layer w5: J1.A31@1117.52,642.6 1117.52,555.7 1057.56,495.75 501.16,495.75 397.16,599.75 397.16,3046.15 515.01,3164 2416.68,3164 2452.79,3127.9 J2.A29@2452.79,3039.12
A32/A30: J1.A32 J2.A30 | length 5153.5
  Top Layer w5: J1.A32@1030.9,583.54 963.11,515.75 509.25,515.75 422.69,602.31 422.69,3043.4 529.29,3150 2289,3150 2334.68,3104.32 J2.A30@2334.68,3039.12
A33/A25: J1.A33 J2.A25 | length 4217
  Top Layer w5: J1.A33@684.44,583.54 511,583.54 481.16,613.39 481.16,3066.15 549.32,3134.31 1574.78,3134.31 1768.4,2940.69 J2.A25@1921.29,2940.69
AGND: J1.A29 J1.B29 J1.B30 J1.C10 J1.C11 J1.D8 J1.D30 J1.D31 J2.C26 J3.B26 | length 11541.8
  Top Layer w10: 3294.69,652.44 3294.69,722.54 3347.38,775.23 3347.38,818.24 J1.C10@3345.86,819.76
  Top Layer w15: J1.B30@2404.91,583.54 2501.96,486.5 3269.04,486.5 v1(3294.69,512.15)
  Top Layer w20: v1(283,2890) 283,454.42 528.43,208.99 1154.74,208.99 1290.74,344.99 ; J1.A29@1290.74,642.6 1290.74,344.99 ; J1.B29@2491.53,642.6 2443.71,594.78 2416.15,594.78 J1.B30@2404.91,583.54 2166.36,344.99 1290.74,344.99 ; J1.C11@3259.24,878.82 J1.C11@3265.79,872.27 ; v1(3294.69,512.15) 3294.69,652.44 ; J1.C10@3334.62,831 J1.C10@3345.86,819.76 ; J1.D31@3951.11,631.83 J1.D31@3940.34,642.6 3940.34,595.26 3952.06,583.54 J1.D30@4026.96,583.54 ; v1(4027.91,489.15) 4789.16,489.15 4838,537.99 4838,710.17 4728.41,819.76 J1.D8@4719.87,819.76 4884,983.89 v1(4884,1345.15) ; J3.B26@4726.41,3035.43 4884,2877.84 v1(4884,1593.15)
  Bottom Layer w20: v1(283,2890) 283,2965 357.12,3039.12 J2.C26@582.71,3039.12 ; J1.C11@3259.24,878.82 3307.06,831 3334.62,831 J1.C10@3345.86,819.76 ; v1(3294.69,512.15) 3317.69,489.15 v1(4027.91,489.15) 4027.44,489.63 4027.44,583.07 J1.D30@4026.96,583.54 ; v1(4884,1345.15) v1(4884,1593.15)
B6/D-0: J1.B6 J8.1 | length 1625.5
  Top Layer w5: J1.B6@1810.43,1016.61 1810.43,1142.43 1892,1224 2733.43,1224 2761.43,1252 v1(3009,1252)
  Bottom Layer w5: J8.1@2957.74,1486.49 3009,1435.23 v1(3009,1252)
B11/A32: J1.B11 J2.A32 | length 4290.7
  Top Layer w5: v1(1470.08,819.76) 1497.16,819.76 1543.38,773.54 1543.38,535.79 1610.33,468.84 1818.85,468.84 v1(1911.16,561.15) ; v1(1478.78,1976) 1478.78,1997.78 1736.16,2255.16 v1(1736.16,2502.09)
  Bottom Layer w5: v1(1470.08,819.76) 1470.08,846.08 1513.47,889.47 1513.47,970.92 1654.77,1112.23 1654.77,1148.43 1654.77,1800 v1(1478.78,1976) ; v1@1736.16,2503 1736.16,3032.16 1812,3108 2029.57,3108 J2.A32@2098.46,3039.12 ; v1(1911.16,561.15) 1943.49,561.15 1968.55,536.08 2108.09,536.08 2152.16,580.15 2152.16,661.21 2318.3,827.36 J1.B11@2318.3,878.82
B12/A31: J1.B12 J2.A31 | length 3536.9
  Top Layer w5: v1(1435,1976) 1700.16,2241.16 v1(1700.16,2503.09) ; v1(1630.46,1148.43) 1744.88,1148.43 1763.16,1130.15 1763.16,997.6 1809.61,951.15 2206.22,951.15 2231.69,925.69 J1.B12@2231.69,819.76
  Bottom Layer w5: v1(1435,1976) 1630.46,1780.54 v1(1630.46,1148.43) ; v1@1700.16,2504 1700.16,2545.3 1700.16,2570.67 1700.16,3025.16 1800,3125 2130.69,3125 J2.A31@2216.57,3039.12
B13/A21: J1.B13 J2.A21 | length 3978.3
  Top Layer w5: v1(2130,1275.15) 2604.16,1275.15 2631,1248.31 v1(2632.47,1248.31) ; v1(2765,2079) 2765.08,2078.92 2765.08,1816.23 v1@2765.16,1816.15
  Bottom Layer w5: v1(2130,1275.15) 2130,918.62 2130.96,917.65 2130.96,892.93 J1.B13@2145.07,878.82 ; J2.A21@2393.73,2940.69 2393.73,3086.73 2454.23,3147.23 2965.15,3147.23 3048,3064.38 3048,2417.24 3114.81,2350.43 3114.81,2200.8 2993.01,2079 v1(2765,2079) ; v1(2632.47,1248.31) 2631,1249.78 2631,1280.14 2700.68,1349.82 2700.68,1792.68 2724.15,1816.15 v1@2765.16,1816.15
  other v1: 2765,1816.15
B15/A9: J1.B15 J2.A9 | length 2280.4
  Top Layer w5: v1(1597,2000) 1892.86,2295.86 v1(1892.86,2502.09)
  Bottom Layer w5: v1(1597,2000) 1773,2000 1983.28,1789.72 1983.28,890.26 J1.B15@1971.84,878.82 ; J2.A9@1862.24,2724.16 1823.6,2685.52 1823.6,2650.69 1892.86,2581.44 v1(1892.86,2502.09)
B17/A34: J1.B17 J2.A34 | length 2398.4
  Top Layer w5: v1(1560,1976) 1560,2007 1805.16,2252.16 v1(1805.16,2502.09) ; v1(1723.81,1124.12) 1726.85,1124.12 1753.16,1097.81 1753.16,993.46 1798.62,948 J1.B17@1798.62,878.82
  Bottom Layer w5: v1(1560,1976) 1723.81,1812.19 v1(1723.81,1124.12) ; v1(1805.16,2502.09) 1790.16,2517.09 1790.16,2883.84 1862.24,2955.92 J2.A34@1862.24,3039.12
B20/A11: J1.B20 J2.A11 | length 2322.8
  Top Layer w5: J1.B20@2578.14,701.65 2684.65,701.65 2733.16,750.16 2733.16,1108.15 v1(2709.16,1132.15) ; v1(2608.16,1778.05) v1@2608.16,1960.08
  Bottom Layer w5: v1(2608.16,1778.05) 2608.16,1199.84 2675.85,1132.15 v1(2709.16,1132.15) ; v1(2608.16,1965.15) 2608.16,2377.24 2629.95,2399.04 J2.A11@2629.95,2822.58
B23/B15: J1.B23 J3.B15 | length 3513.7
  Top Layer w5: J1.B23@2318.3,760.71 2318.3,812.54 2350.88,845.13 ccw(c2318.3,878.82) 2351.99,846.23 2496.02,990.26 2496.02,1071.02 2625,1200 2695.69,1200 v1(2696,1199.69) ; v1(2782.8,1200) v1(3066,1200) ; v1(3317.86,1827.84) 3281.73,1863.97 3281.73,2222.61 v1(3346.16,2287.04) ; v1@3318.29,1828.27 v1@3318.72,1827.84 ; v1(3346.16,2410.15) 3346.16,2484.72 3477.58,2616.15 4009.98,2616.15 4076.8,2682.97 J3.B15@4076.8,2818.9
  Bottom Layer w5: v1(2696,1199.69) 2696.16,1199.84 2782.64,1199.84 v1(2782.8,1200) ; v1(3066,1200) 3086.78,1179.22 3150.94,1179.07 ccw(c3151,1203.38) 3151.51,1179.07 3233.71,1180.79 3292.56,1239.64 3292.56,1758.21 3317.86,1783.51 v1(3317.86,1827.84) ; v1(3346.16,2287.04) v1(3346.16,2410.15)
B26/A22: J1.B26 J2.A22 | length 4253.7
  Top Layer w5: v1(1891.16,891.15) 1891.16,892.25 1924.6,925.69 2184.82,925.69 v1(2203.85,906.66) ; v1(2683,1841) v1(2683,1965.15) ; v1(2925,2443) 2925,2443.34 3082,2600.34 v1(3082,2600.69)
  Bottom Layer w5: J1.B26@1706.42,707.24 v1@1890.33,891.15 ; v1(2203.85,906.66) 2204.25,906.66 2380,1082.4 2380,1752 2469,1841 v1(2683,1841) ; J2.A22@2275.62,2940.69 2275.62,3089.62 2343.23,3157.23 2970.77,3157.23 3082,3046 v1(3082,2600.69) ; v1(2683,1965.15) 2683,2114 2810.99,2241.99 2810.99,2328.99 v1(2925,2443)
B31/B16: J1.B31 J3.B16 | length 3449.4
  Top Layer w5: J1.B31@2318.3,642.6 2418.3,642.6 2479.71,704 2505.78,704 2562.49,760.71 2610.72,760.71 2658.85,808.84 2658.85,1123.84 2762.7,1227.69 v1(3093.18,1227.69) ; v1(3245.16,1827.84) v1(3245.16,2286.01) ; v1(3245.16,2410.15) 3245.54,2410.53 3245.54,2426.53 3588.32,2769.31 3909.11,2769.31 J3.B16@3958.69,2818.9 J3.B16@3958.69,2812.03
  Bottom Layer w5: v1(3093.18,1227.69) 3228.69,1227.69 3271,1270 3271,1758 3245.16,1783.84 v1(3245.16,1827.84) ; v1@3245.16,2283.62 v1(3245.16,2286.01) v1(3245.16,2410.15)
B32/OUT-1: J1.B32 J6.1 | length 2168
  Top Layer w5: v1(1894,1979) 1894,2061.99 2118.5,2286.49 J6.1@2357.74,2286.49 ; v1(2058.46,892.25) 2117.23,833.47 2117.23,642.32 J1.B32@2058.46,583.54 J1.B32@2074.49,583.54
  Bottom Layer w5: v1(1894,1979) 1894,1910 2003,1801 2003,947.7 v1(2058.46,892.25)